# Altium PCB Smart-Button-PCB-v2.1.PcbDoc (part 2 of 2)
Units mm, origin at the board's own origin, x right, y up, seen from the top; angles counter-clockwise.
Board outline 90 x 83 mm, 2 copper layers (Top Layer, Bottom Layer), stack 1.17 mm thick; 43 components, 20 nets, 162 pads, 0 vias.
Unrouted connection lines stored in the file: 71.
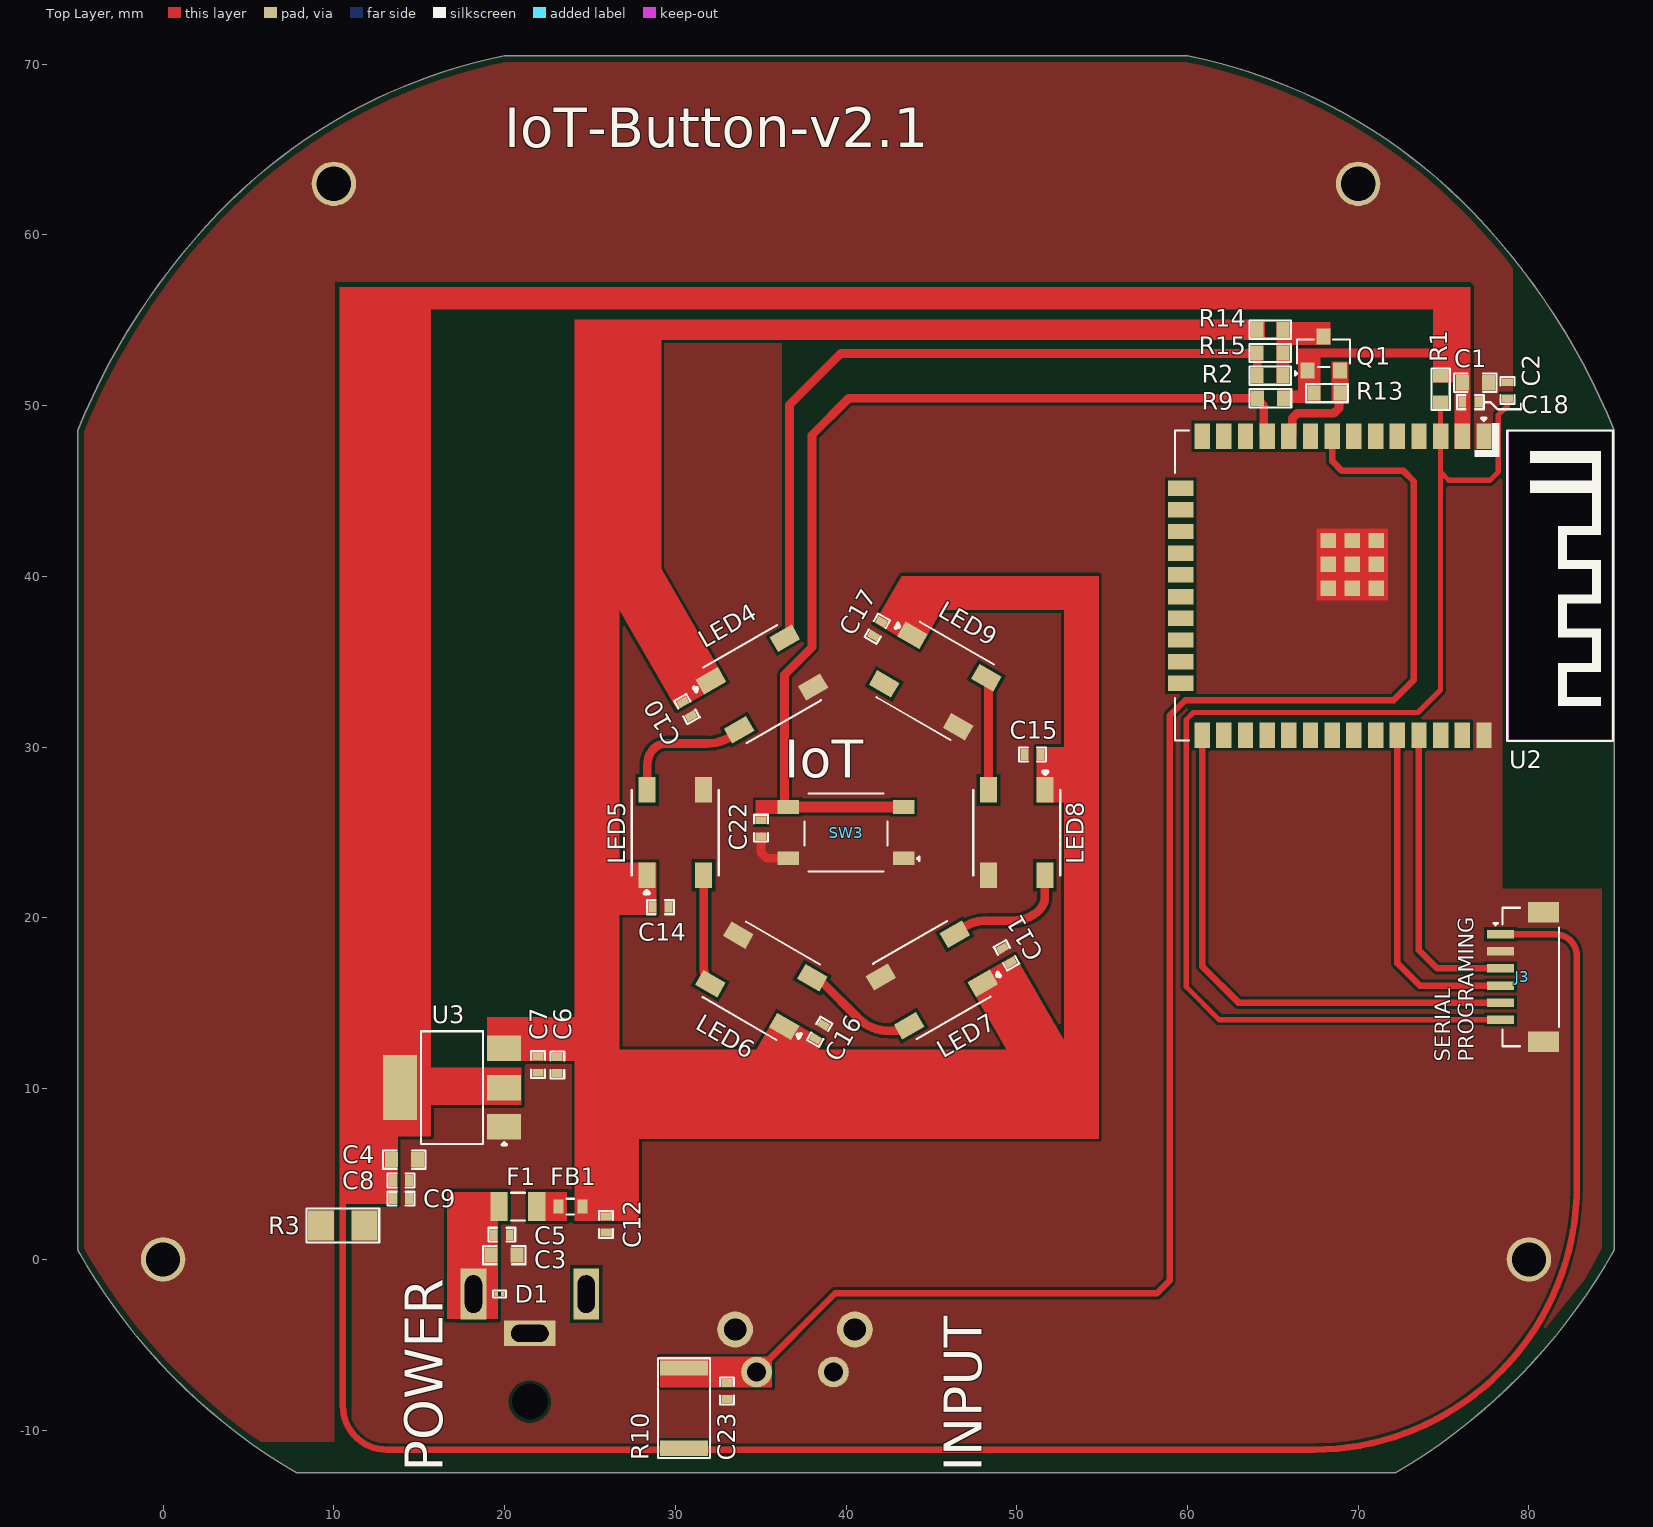
[diagram p0: Top Layer view]

## Silkscreen, mask and mechanical layers (free items; w line width, h text height) (continued)
Drill Drawing: (continued)
  text "= Routed Path Length + Tool Size = Slot length as defined in the PCB layout" at 147.056,28.068 h1.52

## Dimensions
60.147,70.714 to 72.195,-12.5 on Deimensions
85,0.544 to 85,48.544 on Deimensions
85,0.544 to -5,0.544 on Deimensions
7.29,-12.548 to 72.195,-12.5 on Deimensions

## Text inside footprints (layer, text, board x,y; h text height)
SW4: Bottom Overlay "PCB Edge" at 39.147,-8.747 h1